# Altium PCB Right-PCB-v1.0.PcbDoc (part 1 of 2)
Units mil, origin at the board's own origin, x right, y up, seen from the top; angles counter-clockwise.
Board outline 1062.99 x 944.88 mil, 4 copper layers (Top Layer, GND, PWR, Bottom Layer), stack 45.118 mil thick; 85 components, 60 nets, 287 pads, 128 vias.
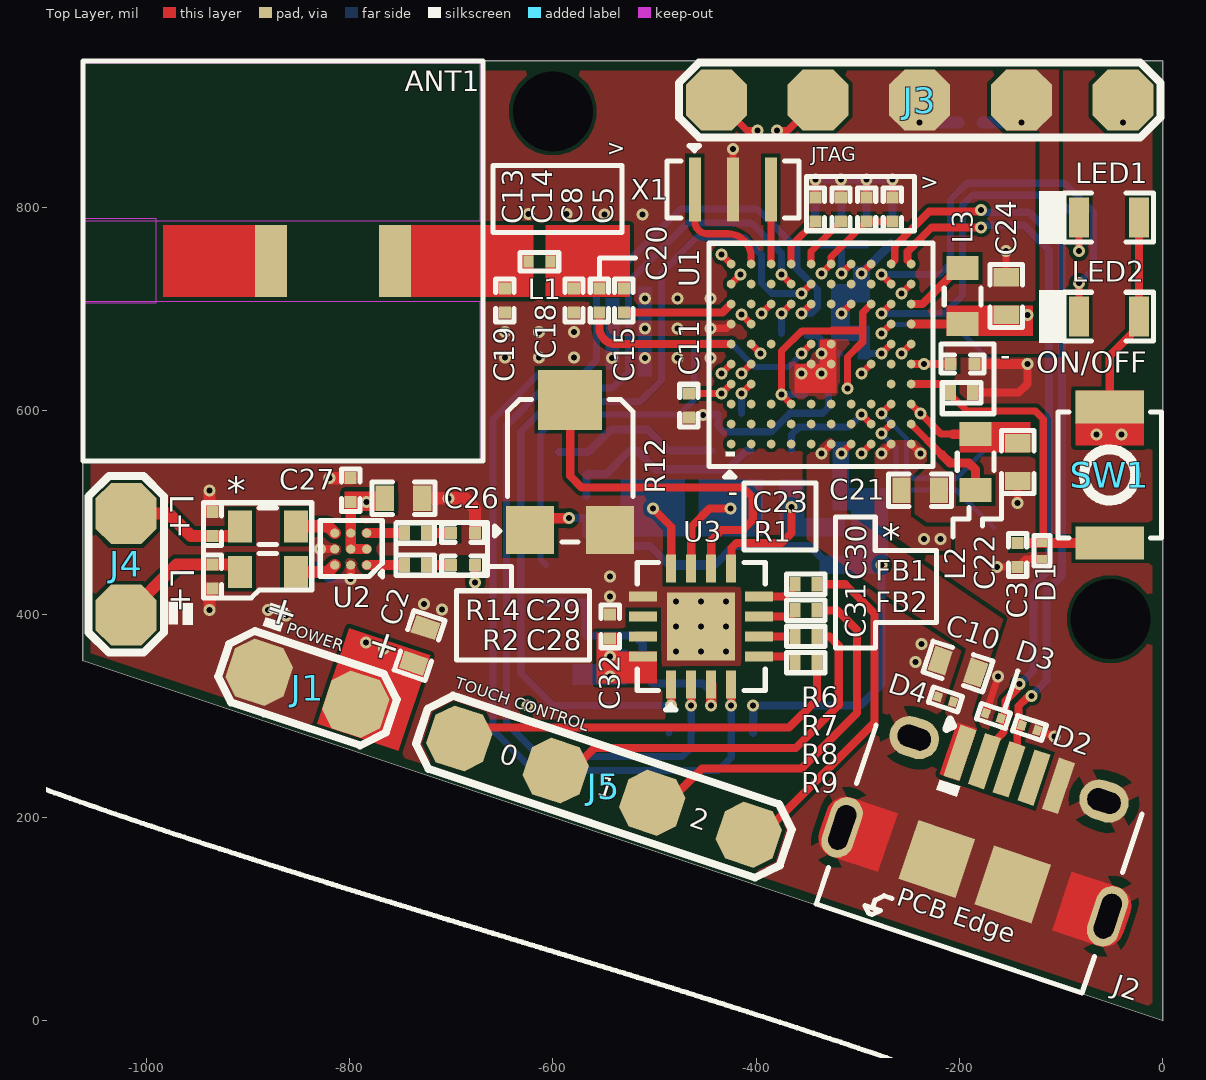
[diagram p0: Top Layer view]
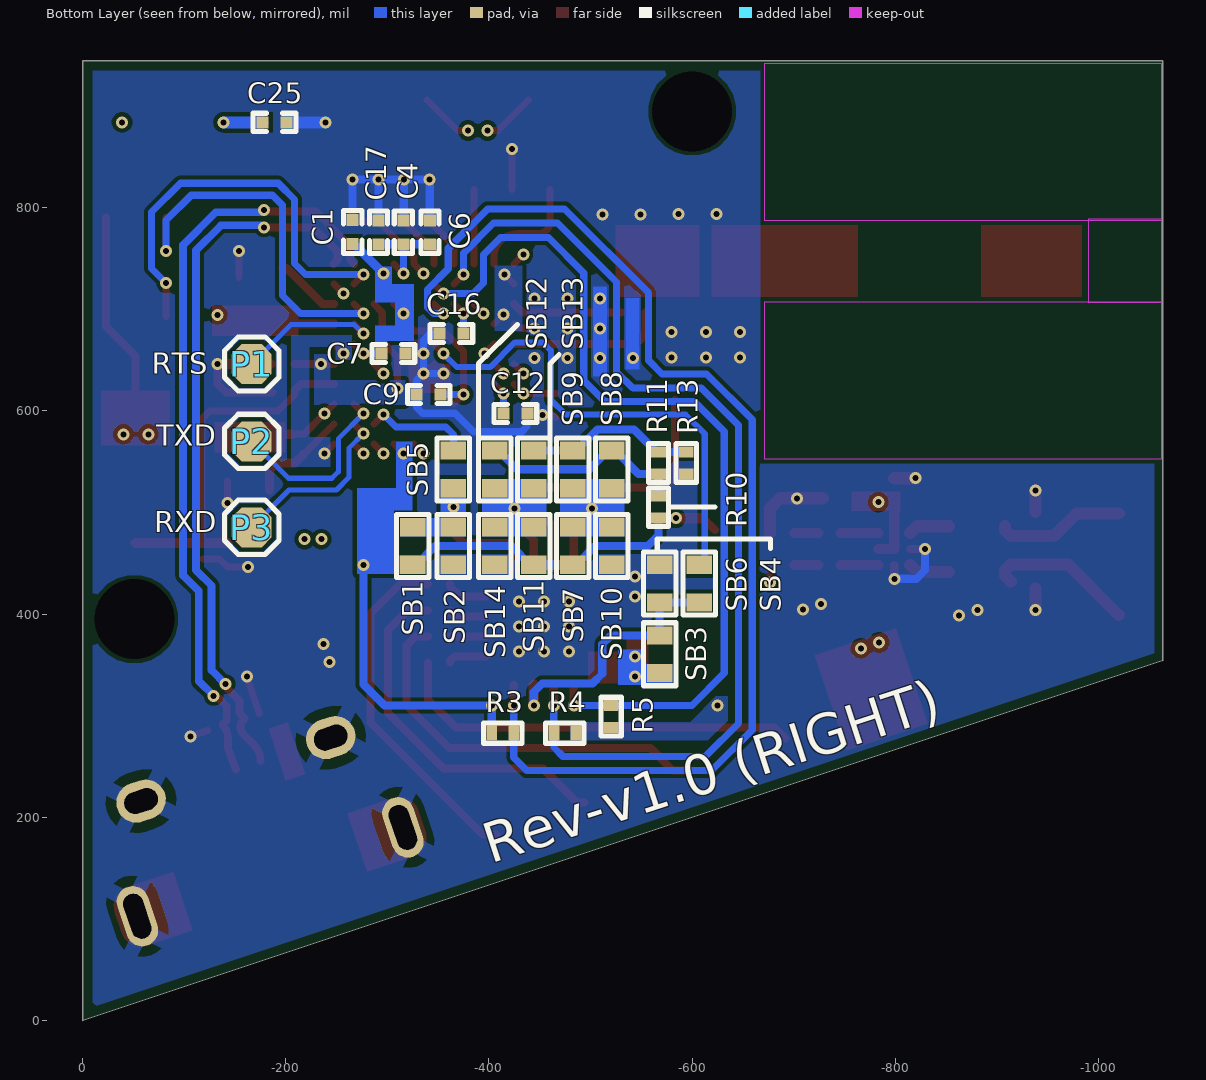
[diagram p1: Bottom Layer view, seen from below]
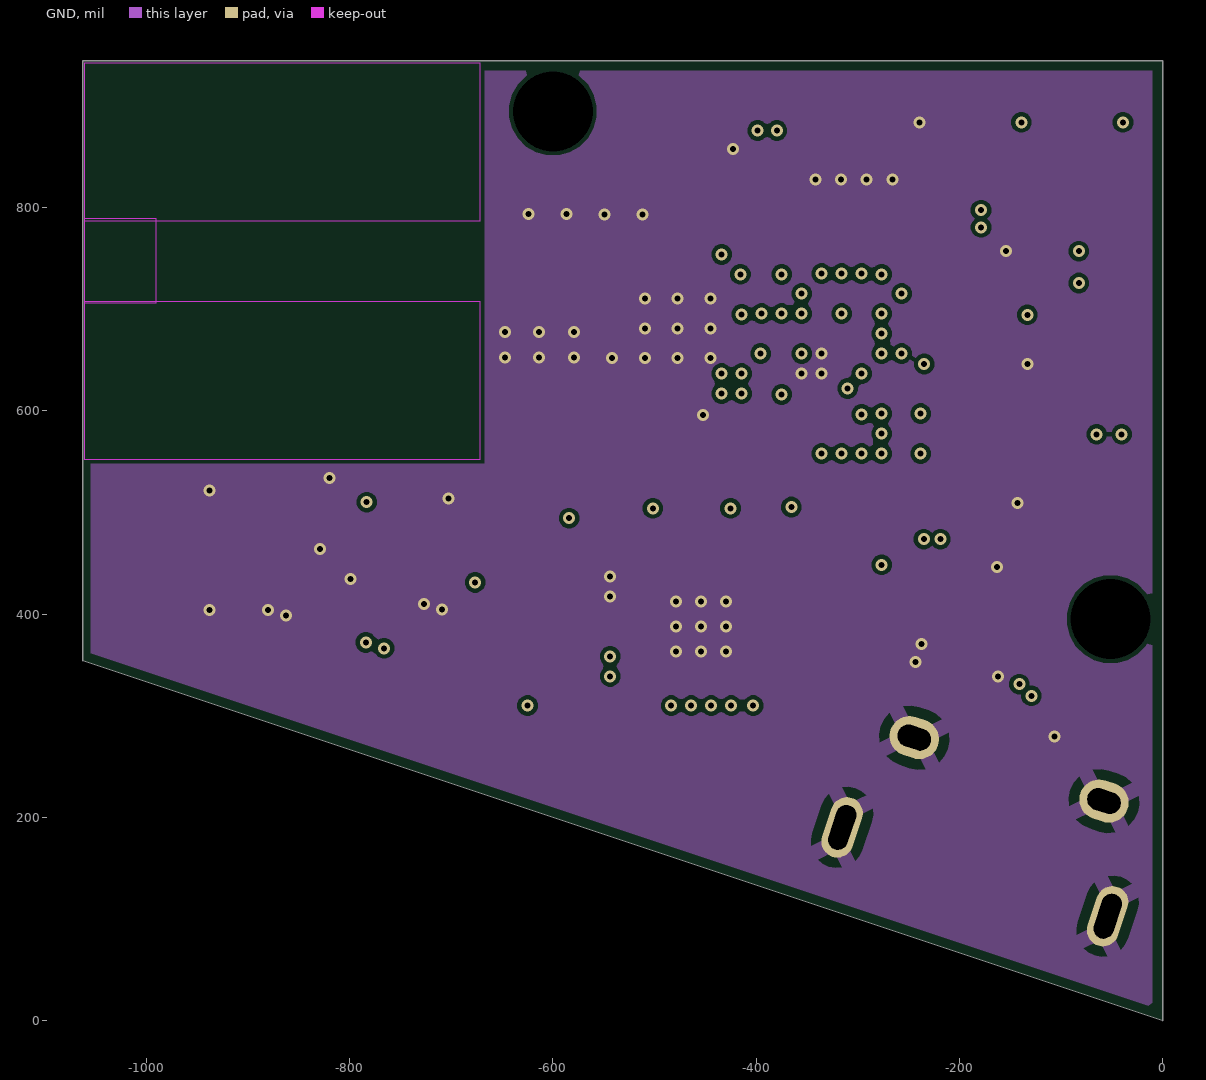
[diagram p2: GND]
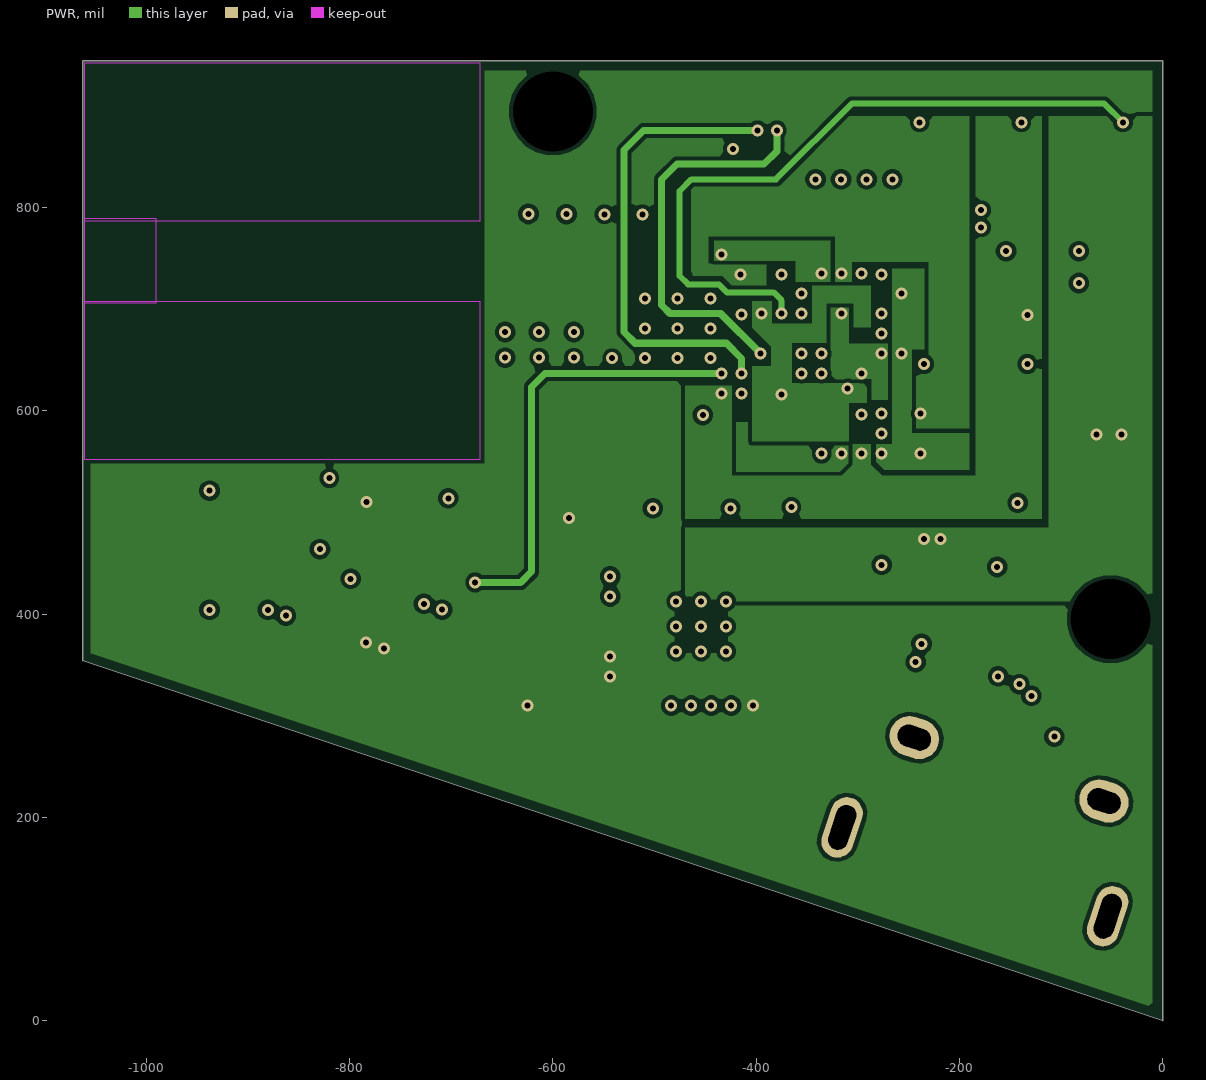
[diagram p3: PWR]
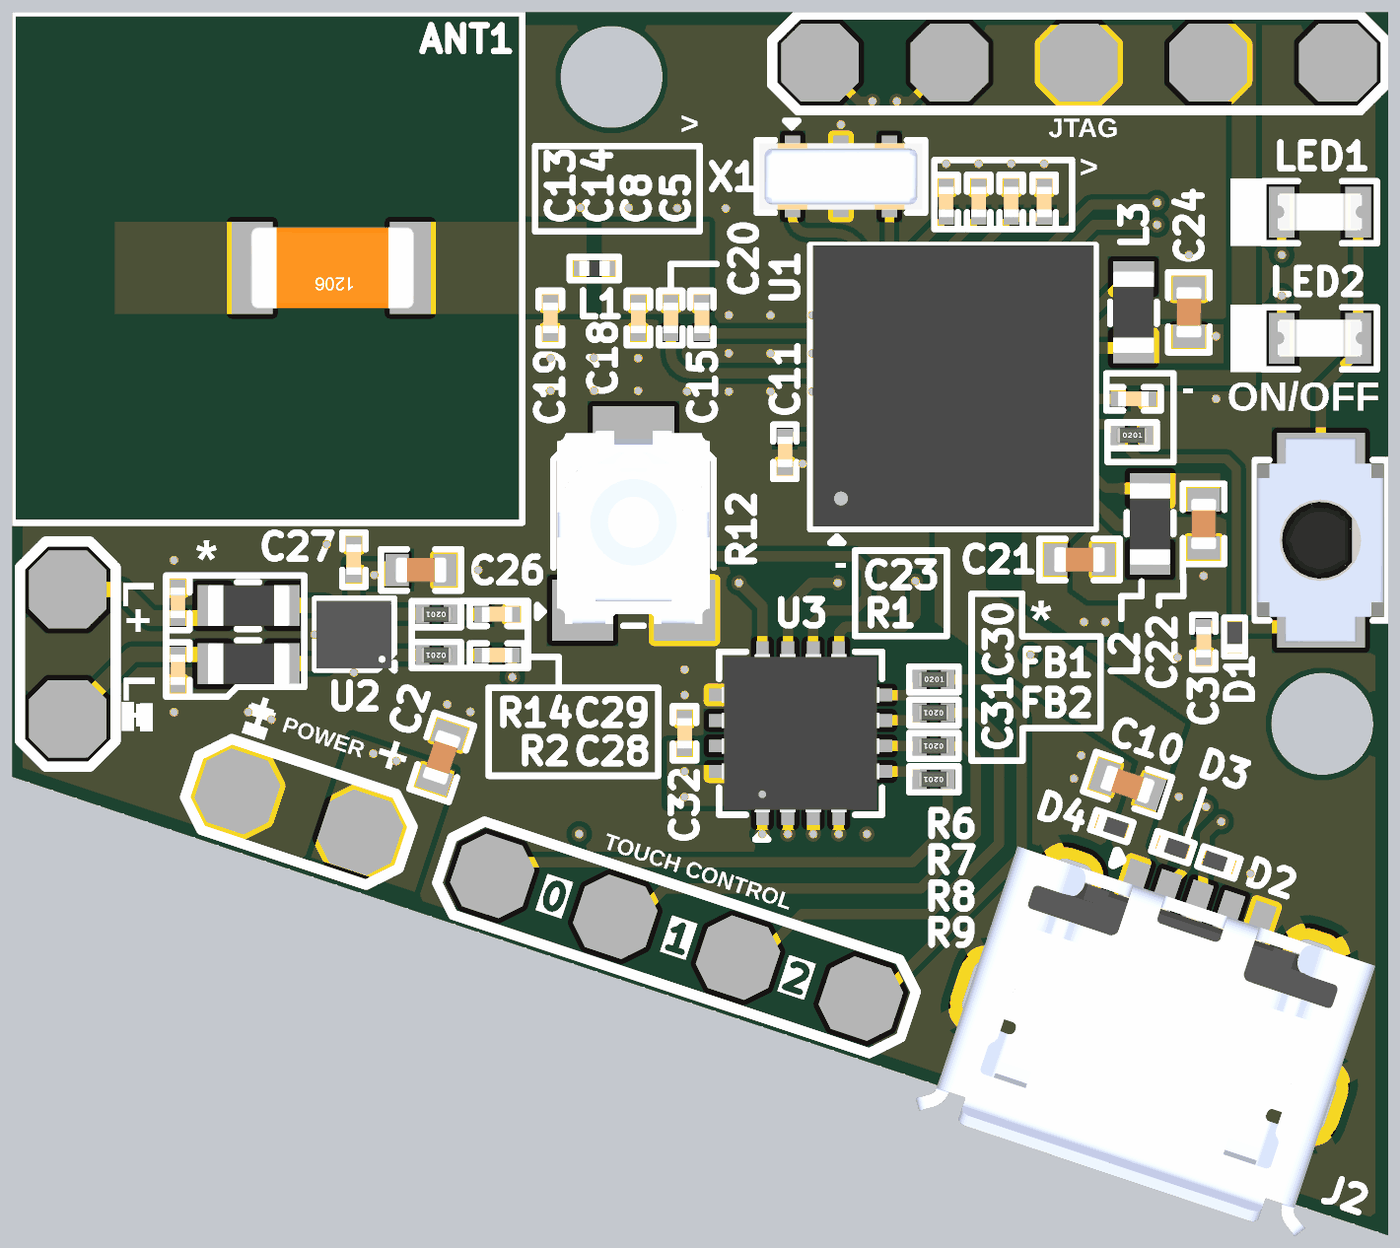
[diagram p4: 3D render of the assembled board from above, using the file's embedded part models]
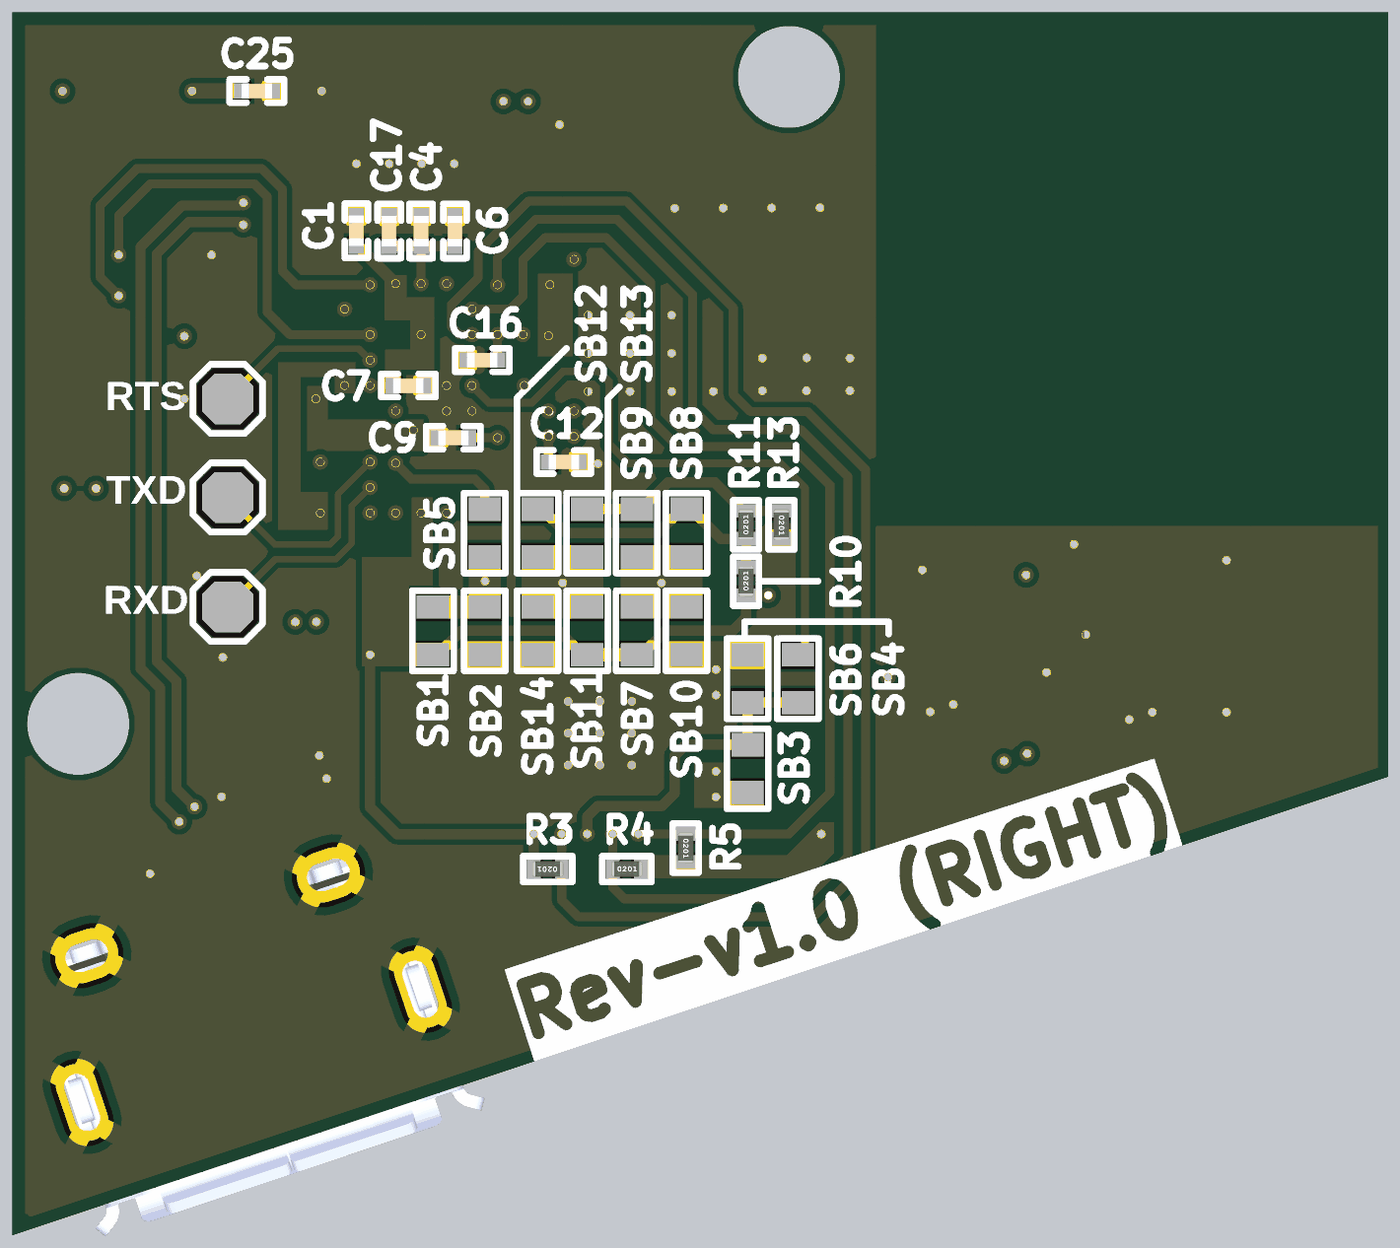
[diagram p5: 3D render of the assembled board from below, using the file's embedded part models]

## Layer stack, top to bottom
Top Solder: solder mask 1.2, Solder Resist, Dk 3.8
Top Layer: signal copper 1.378
Dielectric 2: prepreg 7.992, PP-006, Dk 4.4
GND: signal copper 1.378
Dielectric 1: core 23.622, FR-4, Dk 4.6
PWR: signal copper 1.378
Dielectric 3: prepreg 7.992, PP-006, Dk 4.4
Bottom Layer: signal copper 1.378
Bottom Solder: solder mask 1.2, Solder Resist, Dk 3.8

## Board outline
-1062.99,354.33 0,0 0,944.88 -1062.99,944.88

## Design rules (kind name [scope] priority, off if disabled: settings)
Clearance [All] p1: gap=4 ignorepadtopadclearanceinfootprint=FALSE except(3: Arc-SMDPad Track-SMDPad SMDPad-Via)
ComponentClearance [All] p1: gap=0 collisioncheckmode=3 verticalgap=10 showdistances=FALSE
DiffPairsRouting [InDifferentialPair('USB_D')] p1: maxlimit=5 minlimit=5 mostfreqgap=5 toplayer_minwidth=7.69 toplayer_maxwidth=7.69 toplayer_prefwidth=7.69 midlayer1_minwidth=4.12 midlayer1_maxwidth=4.12 midlayer1_prefwidth=4.12 midlayer2_minwidth=4.12 midlayer2_maxwidth=4.12 midlayer2_prefwidth=4.12 bottomlayer_minwidth=7.69 bottomlayer_maxwidth=7.69 bottomlayer_prefwidth=7.69 impedanceprofiledriven=TRUE impedanceprofileid={24969855-E114-4682-9538-0512A291AC3E} impedanceprofilevalue=90.000000 maxuncoupledlength=500
MatchedLengths "Schematic Matched Net Lengths" [InNetClass('GSM_USB')] p1: tolerance=50 checknetsindiffpair=TRUE checkdiffpairvsdiffpair=FALSE checkxsignals=FALSE checkothers=FALSE
MaxMinImpedance "Schematic Impedance Constraint" [InNetClass('GSM_USB')] p1: minimum=85.00 maximum=90.00
MinimumSolderMaskSliver [All] p1: minsoldermaskwidth=0
PolygonConnect [All] p1: thpad.connectstyle=Relief thpad.reliefconductorwidth=15 thpad.reliefentries=4 thpad.polygonreliefangle="45 Angle" thpad.airgapwidth=10 smdpad.connectstyle=Direct smdpad.reliefconductorwidth=10 smdpad.reliefentries=4 smdpad.polygonreliefangle="90 Angle" smdpad.airgapwidth=10 via.connectstyle=Direct via.reliefconductorwidth=10 via.reliefentries=4 via.polygonreliefangle="90 Angle" via.airgapwidth=10
RoutingVias [All] p1: holewidth=5.91 width=11.81 viastyle="Through Hole" minholewidth=5.91 minwidth=11.81 maxholewidth=5.91 maxwidth=11.81
SilkToSilkClearance [All] p1: silktosilkclearance=0
SilkToSolderMaskClearance [IsPad] p1: minsilkscreentomaskgap=0 clearancetoexposedcopper=TRUE
SolderMaskExpansion SolderMaskExpansion_Via [isvia] p1: expansion=4 istentingtop=TRUE useseparateexpansions=TRUE expansionbottom=4 istentingbottom=TRUE
SolderMaskExpansion [All] p2: expansion=4 istentingtop=FALSE
UnRoutedNet [All] p1: checkbadconnections=TRUE
Width Width_50-Ohm [(InNet('PA1OP') OR InNet('RTX'))] p1: maxlimit=8 minlimit=5.11 preferedwidth=8 toplayer_minwidth=8 midlayer1_maxwidth=5.11 midlayer1_prefwidth=5.11 midlayer2_maxwidth=5.11 midlayer2_prefwidth=5.11 bottomlayer_minwidth=8 impedanceprofiledriven=TRUE impedanceprofileid={FD0E59BD-C75E-4E98-98D1-FE3D62779C59} impedanceprofilevalue=50.000000 minimp=50.000000 maximp=50.000000 favimp=50.000000
Width [All] p2: maxlimit=15 minlimit=4 preferedwidth=6
24 further rules are at their usual default settings.

## Classes and differential pairs
differential pair class GSM_USB_Lines: USB_D
net class GSM_USB: USB_D_N USB_D_P
component class U_Touch_Amplifier: C26 C27 C28 C29 C30 C31 C32 FB1 FB2 J4 J5 R2 R3 R4 R5 R6 R7 R8 R9 R10 R11 R12 R13 R14 SB1 SB2 SB3 SB4 SB5 SB6 SB7 SB8 SB9 SB10 SB11 SB12 SB13 SB14 U2 U3
component class U_Bluetooth_SOC: ANT1 C1 C2 C3 C4 C5 C6 C7 C8 C9 C10 C11 C12 C13 C14 C15 C16 C17 C18 C19 C20 C21 C22 C23 C24 C25 D1 D2 D3 D4 J1 J2 J3 L1 L2 L3 LED1 LED2 P1 P2 P3 R1 SW1 U1 X1
differential pair USB_D: +USB_D_P -USB_D_N

## Components (designator, comment, footprint, x,y, rotation, side; value= is the part's Value field where it differs from the comment)
ANT1 "ANT3216LL00R2400A" ANT3216LL00R2400A -755.5,747.38 r180 top locked
C1 "1uF" Cap-0201 -265.87,776.08 r90 bottom locked
C2 "10uF" Cap-0402 -731.18,369.25 r71.6 top locked
C3 "0.1uF" CAP-0201 -142.64,458.23 r90 top locked
C4 "1uF" Cap-0201 -315.85,775.81 r270 bottom locked
C5 "1uF" Cap-0201 -265.87,798.31 r270 top locked
C6 "1uF" Cap-0201 -342,775.81 r270 bottom locked
C7 "1uF" Cap-0201 -306,656.46 r180 bottom locked
C8 "1uF" Cap-0201 -291.29,798.31 r270 top locked
C9 "1uF" Cap-0201 -340.76,616.17 r0 bottom locked
C10 "10uF" Cap-0402 -201.39,348.36 r161.5 top locked
C11 "1uF" Cap-0201 -466.14,605.28 r90 top locked
C12 "1uF" Cap-0201 -426.09,597.41 r180 bottom locked
C13 "1uF" Cap-0201 -341.51,798.31 r90 top locked
C14 "1uF" Cap-0201 -316.4,798.31 r90 top locked
C15 "2pF" CAP-0201 -530.28,708.66 r90 top locked
C16 "1uF" Cap-0201 -363.1,676.15 r0 bottom locked
C17 "1uF" Cap-0201 -291.29,775.81 r270 bottom locked
C18 "1.3pF" CAP-0201 -579.29,708.66 r90 top locked
C19 "3pF" CAP-0201 -647.28,708.66 r90 top locked
C20 "3pF" CAP-0201 -554.29,708.66 r90 top locked
C21 "10uF" Cap-0402 -238.5,522 r180 top locked
C22 "10uF" Cap-0402 -142.64,549.56 r90 top locked
C23 "1uF" Cap-0201 -196.85,646.16 r180 top locked
C24 "10uF" Cap-0402 -154,713.09 r270 top locked
C25 "0.1uF" CAP-0201 -189,884 r0 bottom locked
C26 "10uF" Cap-0402 -747.14,514 r180 top locked
C27 "0.1uF" CAP-0201 -799,522 r270 top locked
C28 "1uF" Cap-0201 -688.39,448.25 r180 top locked
C29 "1uF" Cap-0201 -688.39,479.75 r180 top locked
C30 "1uF" Cap-0201 -935.04,488.62 r270 top locked
C31 "1uF" Cap-0201 -935.04,437.02 r90 top locked
C32 "0.1uF" CAP-0201 -543.62,387.87 r90 top locked
D1 "PESD5V0H1BSFYL" DSN0603-2 -118.62,462.17 r90 top locked
D2 "PESD5V0H1BSFYL" DSN0603-2 -130.87,287.99 r161.5 top locked
D3 "PESD5V0H1BSFYL" DSN0603-2 -166.47,299.88 r341.5 top locked
D4 "PESD5V0H1BSFYL" DSN0603-2 -213.59,316.11 r341.5 top locked
FB1 "MPZ1608S221ATA00" "IND-0603 (1608 Metric)" -880.33,486.46 r180 top locked
FB2 "MPZ1608S221ATA00" "IND-0603 (1608 Metric)" -880.33,441.54 r180 top locked
J1 "2 Test Pad" "2 Test Pad" -794.09,311.3 r161.6 top locked
J2 "10118194-0001LF" 10118194-0001LF_ -150.94,247.2 r341.5 top locked
J3 "5 Test Pad" "5 Test Pad" -39,906 r180 top locked
J4 "2 Test Pad" "2 Test Pad" -1020,499 r270 top locked
J5 "4 Pin SMD Wire Connector" "4 Pin SMD Wire CON." -692.08,277.61 r341.6 top locked
L1 "2.7nH" IND-0201 -613.27,746.89 r180 top locked
L2 "10uH" "IND-0603 (1608 Metric)" -184,549.56 r90 top locked
L3 "10uH" "IND-0603 (1608 Metric)" -196.85,713.09 r270 top locked
LED1 "Blue" LED-0603 -52.8,790.32 r180 top locked
LED2 "RED" LED-0603 -52.8,692.83 r180 top locked
P1 "TEST POINT 0.5mm Dia" "Test-point - 0.5mm" -166.5,646.16 r180 bottom locked
P2 "TEST POINT 0.5mm Dia" "Test-point - 0.5mm" -166.5,570 r180 bottom locked
P3 "TEST POINT 0.5mm Dia" "Test-point - 0.5mm" -166.5,485.5 r180 bottom locked
R1 "1K" Res-0201 -197.83,618 r0 top locked
R2 "15k" Res-0201 -735.36,448.25 r180 top locked
R3 "4.7K" Res-0201 -413.66,282.93 r0 bottom locked
R4 "4.7K" Res-0201 -474.75,282.93 r180 bottom locked
R5 "4.7K" Res-0201 -520.22,299.17 r270 bottom locked
R6 "1K" Res-0201 -351.02,429.43 r0 top locked
R7 "100K" Res-0201 -351.02,403.72 r180 top locked
R8 "100K" Res-0201 -351.02,378.03 r180 top locked
R9 "100K" Res-0201 -351.02,352.27 r180 top locked
R10 "100K" Res-0201 -566.89,505.33 r90 bottom locked
R11 "100K" Res-0201 -566.89,548.82 r90 bottom locked
R12 "1M" TC33X-2-105E -582.99,546.89 r0 top locked
R13 "100K" Res-0201 -594.22,548.82 r270 bottom locked
R14 "15k" Res-0201 -735.36,479.75 r180 top locked
SB1 "Solder Bridge 0402" "Solder Bridge 0402" -325,467 r90 bottom locked
SB2 "Solder Bridge 0402" "Solder Bridge 0402" -365.07,467 r90 bottom locked
SB3 "Solder Bridge 0402" "Solder Bridge 0402" -568,360.5 r90 bottom locked
SB4 "Solder Bridge 0402" "Solder Bridge 0402" -568,430 r270 bottom locked
SB5 "Solder Bridge 0402" "Solder Bridge 0402" -365.07,542.5 r270 bottom locked
SB6 "Solder Bridge 0402" "Solder Bridge 0402" -606.89,430 r270 bottom locked
SB7 "Solder Bridge 0402" "Solder Bridge 0402" -482.51,467 r270 bottom locked
SB8 "Solder Bridge 0402" "Solder Bridge 0402" -520.84,542.5 r90 bottom locked
SB9 "Solder Bridge 0402" "Solder Bridge 0402" -482.51,542.5 r90 bottom locked
SB10 "Solder Bridge 0402" "Solder Bridge 0402" -520.84,467 r270 bottom locked
SB11 "Solder Bridge 0402" "Solder Bridge 0402" -444.17,467 r270 bottom locked
SB12 "Solder Bridge 0402" "Solder Bridge 0402" -405.84,542.5 r90 bottom locked
SB13 "Solder Bridge 0402" "Solder Bridge 0402" -444.17,542.5 r90 bottom locked
SB14 "Solder Bridge 0402" "Solder Bridge 0402" -405.84,467 r270 bottom locked
SW1 "B3U-1000P" B3U-1000P -52.01,536.97 r270 top locked
U1 "IS2083BM-232" 82-VFBGA -336,656 r90 top locked
U2 "TPA2011D1YFFR" 9-DSBGA -799,464 r180 top locked
U3 "MTCH1030T-E/MG" "16-QFN (3x3)." -454.02,387.87 r90 top locked
X1 "16MHz" SMD3213-3P -422.83,818 r0 top locked

## Footprints (in the part's own frame and the unit in brackets; to place one, negate y for a bottom-side part, rotate by r counter-clockwise, add the part's x,y. Pads: shape width x height; smd on the part's side, far side on the other; paste and mask are expansions set on the pad)
"2 Test Pad" [mil]
  oct 60x60 smd: 1(0,0) 2(100,0)
  silkscreen extent -37,-37 137,37
"4 Pin SMD Wire CON." [mm]
  oct 1.5x1.5 smd: 1(0,0) 2(2.54,0) 3(5.08,0) 4(7.62,0)
  silkscreen extent -0.98,-0.97 8.6,0.97
"5 Test Pad" [mil]
  oct 60x60 smd: 1(0,0) 2(100,0) 3(200,0) 4(300,0) 5(400,0)
  silkscreen extent -37,-37 437,37
9-DSBGA [mm]
  round 0.23 smd mask+0.055: A1(-0.4,0.4) A2(0,0.4) A3(0.4,0.4) B1(-0.4,0) B2(0,0) B3(0.4,0) C1(-0.4,-0.4) C2(0,-0.4) C3(0.4,-0.4)
  silkscreen extent -0.8,-0.71 0.76,0.7, body extent -0.73,-0.67 0.73,0.67, height 0.63
"16-QFN (3x3)." [mm]
  rect 0.7x0.25 smd: 1(-1.45,0.75) 2(-1.45,0.25) 3(-1.45,-0.25) 4(-1.45,-0.75) 9(1.45,-0.75) 10(1.45,-0.25) 11(1.45,0.25) 12(1.45,0.75)
  rect 0.25x0.7 smd: 5(-0.75,-1.45) 6(-0.25,-1.45) 7(0.25,-1.45) 8(0.75,-1.45) 13(0.75,1.45) 14(0.25,1.45) 15(-0.25,1.45) 16(-0.75,1.45)
  rect 1.7x1.7 smd: 17(0,0)
  silkscreen extent -2.08,-1.6 1.6,1.6, body extent -1.55,-1.55 1.55,1.55, height 0.99
82-VFBGA [mm]
  round 0.22 smd paste+0 mask+0.055: A1(-2.25,2.25) A2(-1.75,2.25) A3(-1.25,2.25) A4(-0.75,2.25) A5(-0.25,2.25) A6(0.25,2.25) A7(0.75,2.25) A8(1.25,2.25) A9(1.75,2.25) A10(2.25,2.25) B1(-2.25,1.75) B2(-1.75,1.75) B3(-1.25,1.75) B4(-0.75,1.75) B5(-0.25,1.75) B6(0.25,1.75) B7(0.75,1.75) B8(1.25,1.75) B9(1.75,1.75) B10(2.25,1.75) C1(-2.25,1.25) C2(-1.75,1.25) C3(-1.25,1.25) C6(0.25,1.25) C8(1.25,1.25) C9(1.75,1.25) C10(2.25,1.25) D1(-2.25,0.75) D2(-1.75,0.75) D3(-1.25,0.75) D8(1.25,0.75) D9(1.75,0.75) D10(2.25,0.75) E1(-2.25,0.25) E2(-1.75,0.25) E3(-1.25,0.25) E5(-0.25,0.25) E6(0.25,0.25) E8(1.25,0.25) E9(1.75,0.25) E10(2.25,0.25) F1(-2.25,-0.25) F2(-1.75,-0.25) F3(-1.25,-0.25) F5(-0.25,-0.25) F6(0.25,-0.25) F8(1.25,-0.25) F9(1.75,-0.25) F10(2.25,-0.25) G1(-2.25,-0.75) G2(-1.75,-0.75) G3(-1.25,-0.75) G8(1.25,-0.75) G9(1.75,-0.75) G10(2.25,-0.75) H1(-2.25,-1.25) H2(-1.75,-1.25) H3(-1.25,-1.25) H5(-0.25,-1.25) H8(1.25,-1.25) H9(1.75,-1.25) H10(2.25,-1.25) J1(-2.25,-1.75) J2(-1.75,-1.75) J3(-1.25,-1.75) J4(-0.75,-1.75) J5(-0.25,-1.75) J6(0.25,-1.75) J7(0.75,-1.75) J8(1.25,-1.75) J9(1.75,-1.75) J10(2.25,-1.75) K1(-2.25,-2.25) K2(-1.75,-2.25) K3(-1.25,-2.25) K4(-0.75,-2.25) K5(-0.25,-2.25) K6(0.25,-2.25) K7(0.75,-2.25) K8(1.25,-2.25) K9(1.75,-2.25) K10(2.25,-2.25)
  silkscreen extent -3.07,-2.79 2.77,2.81, body extent -2.76,-2.76 2.76,2.76, height 0.89
10118194-0001LF_ [mm]
  rect 0.42x1.35 smd: 1(-1.3,0) 2(-0.65,0) 3(0,0) 4(0.65,0) 5(1.3,0)
  rect 1.5x1.55 smd: MP1(-1,-2.7) MP2(1,-2.7)
  oval 1.25x1 hole 0.55 slot 0.85 at 0 deg: S1(-2.5,0) S2(2.5,0)
  oval 0.8x1.55 hole 0.5 slot 1.15 at 90 deg: S3(3.5,-2.7) S4(-3.5,-2.7)
  Top Layer region: 193 vertices and 0 holes, not listed, extent 2.3,-3.48 4,-1.925
  Top Layer region: 193 vertices and 0 holes, not listed, extent -4,-3.475 -2.3,-1.92
  silkscreen extent -3.51,-4.72 3.51,0.71, body extent -4.02,-5.34 4.03,0.19, height 2.69
ANT3216LL00R2400A [mm]
  rect 0.8x1.8 smd: 1(0,0) 2(3.1,0)
  Top Layer region: 3.277,-0.9 5.8,-0.9 5.8,0.9 3.277,0.9
  Top Layer region: -0.178,0.9 -2.2,0.9 -2.2,-0.9 -0.178,-0.9
  Keep-Out Layer region: -2.134,-4.953 7.772,-4.953 7.772,-1.016 -2.134,-1.016
  Keep-Out Layer region: -2.134,1.016 7.772,1.016 7.772,4.953 -2.134,4.953
  Keep-Out Layer region: 5.969,-1.067 7.772,-1.067 7.772,1.041 5.969,1.041
  silkscreen extent -2.2,-5 7.8,5, body extent -0.08,-0.8 3.12,0.8, height 1
B3U-1000P [mm] "SWITCH TACTILE SPST-NO 0.05A 12V"
  rect 0.82x1.72 smd: 1(-1.7,0) 2(1.7,0)
  silkscreen extent -1.57,-1.3 1.57,1.3, body extent -2,-1.26 2,1.24, height 1.6
Cap-0201 [mm]
  rect 0.3x0.3 smd mask+0.055: 1(-0.3,0) 2(0.3,0)
  silkscreen extent -0.53,-0.23 0.53,0.23, body extent -0.3,-0.15 0.3,0.15, height 0.28
CAP-0201 [mm]
  rect 0.3x0.3 smd mask+0.055: 1(-0.3,0) 2(0.3,0)
  silkscreen extent -0.53,-0.23 0.53,0.23, body extent -0.3,-0.15 0.3,0.15, height 0.28
Cap-0402 [mil]
  rect 18x25 smd mask+2.36: 1(-18.5,0) 2(18.5,0)
  silkscreen extent -31,-16 31,16, body extent -20,-10 20,10, height 19
DSN0603-2 [mm]
  rect 0.2x0.24 smd mask+0.055: 1(-0.2,0) 2(0.2,0)
  silkscreen extent -0.38,-0.2 0.38,0.2, body extent -0.3,-0.15 0.3,0.15, height 0.32
IND-0201 [mm]
  rect 0.25x0.3 smd mask+0.055: 1(-0.275,0) 2(0.275,0)
  silkscreen extent -0.48,-0.23 0.48,0.23, body extent -0.3,-0.15 0.3,0.15, height 0.15
"IND-0603 (1608 Metric)" [mm] "0.063\" L x 0.032\" W (1.60mm x 0.80mm)"
  rect 0.6x0.8 smd: 1(-0.7,0) 2(0.7,0)
  silkscreen extent -0.2,-0.46 0.23,0.46, body extent -0.8,-0.4 0.8,0.4, height 0.78
LED-0603 [mm]
  rect 0.5x1 smd: 1(-0.75,0) 2(0.75,0)
  silkscreen extent -1.12,-0.66 1.75,0.66, body extent -0.82,-0.37 0.82,0.36, height 0.68
Res-0201 [mm]
  rect 0.27x0.37 smd mask+0.055: 1(-0.275,0) 2(0.275,0)
  silkscreen extent -0.48,-0.25 0.48,0.25, body extent -0.3,-0.15 0.3,0.15, height 0.29
SMD3213-3P [mm]
  rect 0.3x1.6 smd: 1(-0.95,0) 2(0,0) 3(0.95,0)
  silkscreen extent -1.65,-0.71 1.65,1.09, body extent -1.6,-0.65 1.6,0.65, height 1
"Solder Bridge 0402" [mil]
  rect 18x25 smd mask+2.17: 1(-18.5,0) 2(18.5,0)
  silkscreen extent -32,-17 32,16
TC33X-2-105E [mm]
  rect 1.2x1.2 smd: 1(-1,-1.625) 3(1,-1.625)
  rect 1.6x1.5 smd: 2(0,1.625)
  silkscreen extent -1.89,-1.93 1.57,1.63, body extent -1.5,-1.9 1.5,1.9, height 1.2
"Test-point - 0.5mm" [mm]
  oct 1x1 smd: 1(0,0)
  silkscreen extent -0.68,-0.68 0.68,0.68

## Part data
ANT1: "5.05dBi Chip antenna Linear 160MHz 2.45GHz 1W 1206 Antennas ROHS", LCSC Part Number=C293767, Manufacturer=YAGEO, Package=1206, ComponentLink1Description=LCSC, ComponentLink1URL=https://www.lcsc.com/product-detail/Antennas_YAGEO-ANT3216LL00R2400A_C293767.html, Item Type=Antenna, Manufacturer Part Number=ANT3216LL00R2400A
C1 C4 C5 C6 C7 C8 C9 C11 C12 C13 C14 C16 C17 C23 C28 C29 C30 C31: library part CC0201KRX5R5BB105, "CAP CER 1UF 6.3V X5R 0201", Case Code (Imperial)=0201, Case Code (Metric)=0603, LCSC Part Number=C541330, Manufacturer=Yageo, Max Operating Temperature=85°C, Min Operating Temperature=-55°C, Tolerance=10%, Voltage Rating=6.3V, Capacitance=1uF, Case/Package=0201, Category="Ceramic Capacitors", ComponentLink1Description=http://www.yageo.com/documents/recent/UPY-GPHC_X5R_4V-to-50V_25.pdf?src-supplier=Digi-Key, ComponentLink1URL=http://www.yageo.com/documents/recent/UPY-GPHC_X5R_4V-to-50V_25.pdf?src-supplier=Digi-Key, ComponentLink2Description=https://www.yageo.com/upload/media/product/productsearch/datasheet/mlcc/UPY-GPHC_X5R_4V-to-50V_26.pdf?src-supplier=Digi-Key, ComponentLink2URL=https://www.yageo.com/upload/media/product/productsearch/datasheet/mlcc/UPY-GPHC_X5R_4V-to-50V_26.pdf?src-supplier=Digi-Key, Item Type=Capacitor, Manufacturer Part Number=CC0201KRX5R5BB105, Mount="Surface Mount", Packaging="Cut Tape", Pricing 1="15000=0.00740 (USD)", RoHS=Yes, RoHS Compliant=Yes, Stock 1=600000, Supplier 1="Arrow Electronics", Supplier Part Number 1=CC0201KRX5R5BB105
C2 C10 C21 C22 C24 C26: library part CL05A106MP5NUNC, "CAP CER 10UF 10V X5R 0402", Case Code (Imperial)=0402, Case Code (Metric)=1005, Dielectric=X5R, LCSC Part Number=C315248, Manufacturer=Samsung, Max Operating Temperature=85°C, Min Operating Temperature=-55°C, Package Quantity=1, Tolerance=20%, Voltage Rating=10V, Capacitance=10uF, Case/Package=0402, Category="Ceramic Capacitors", ComponentLink1Description=https://datasheet.ciiva.com/25721/cl05a106mp5nunc-25721584.pdf?src-supplier=Digi-Key, ComponentLink1URL=https://datasheet.ciiva.com/25721/cl05a106mp5nunc-25721584.pdf?src-supplier=Digi-Key, ComponentLink2Description=https://datasheet.ciiva.com/26838/getdatasheetpartid-745310-26838170.pdf?src-supplier=Verical, ComponentLink2URL=https://datasheet.ciiva.com/26838/getdatasheetpartid-745310-26838170.pdf?src-supplier=Verical, Construction=Flat, Contact Plating=Tin, Depth=0.5mm, Item Type=Capacitor, Lead Free="Lead Free", Length=1mm, Manufacturer Part Number=CL05A106MP5NUNC, Mount="Surface Mount", Packaging="Tape and Reel", Pricing 1="10000=0.02537 (USD)", Radiation Hardening=No, RoHS=Yes, RoHS Compliant=Yes, Series=CL, Stock 1=1729850, Supplier 1=Avnet, Supplier Part Number 1=CL05A106MP5NUNC, Termination=Wraparound, Thickness=0.028inch, Width=0.02inch
C3 C25 C27 C32: library part CC0201KRX5R6BB104, "CAP CER 0.1UF 10V X5R 0201", Capacitance=100nF, Case Code (Imperial)=0201, Case Code (Metric)=0603, Dielectric=X5R, LCSC Part Number=C190183, Manufacturer=Yageo, Max Operating Temperature=85°C, Min Operating Temperature=-55°C, Resistor Type=Ceramic, Supplier Part Number 1=603-CC201KRX5R6BB104, Tolerance=10%, Voltage Rating=10V, Case/Package=0201, Category="Ceramic Capacitors", ComponentLink1Description=https://datasheet.ciiva.com/11587/upy-gphc-x5r-4v-to-50v-12-11587190.pdf?src-supplier=Avnet, ComponentLink1URL=https://datasheet.ciiva.com/11587/upy-gphc-x5r-4v-to-50v-12-11587190.pdf?src-supplier=Avnet, Construction=Flat, Depth=0.3mm, Halogen Free="Halogen Free", Height=0.3mm, Lead Free="Lead Free", Length=0.6mm, Manufacturer Part Number=CC0201KRX5R6BB104, Mount="Surface Mount", Packaging="Tape and Reel", Pricing 1="1=0.10000, 10=0.02400, 50=0.02400, 100=0.01900, 1000=0.01100, 10000=0.00900 (USD)", Radiation Hardening=No, RoHS=Yes, RoHS Compliant=Yes, Series=CC, Stock 1=824403, Supplier 1=Mouser, Termination=SMD/SMT, Thickness=0.013inch, Voltage Rating (DC)=10V, Weight=6E-06oz, Width=0.012inch
C15: library part GRM0335C1E2R0BA01D, "CAP CER 2PF 25V C0G/NP0 0201", LCSC Part Number=C161383, Manufacturer=Murata, Category="Ceramic Capacitors", ComponentLink1Description=https://datasheet.ciiva.com/29535/grm0335c1e2r0ba01-01-29535294.pdf?src-supplier=Digi-Key, ComponentLink1URL=https://datasheet.ciiva.com/29535/grm0335c1e2r0ba01-01-29535294.pdf?src-supplier=Digi-Key, Item Type=Capacitor, Manufacturer Part Number=GRM0335C1E2R0BA01D, Pricing 1="1=0.053, 10=0.0058, 25=0.004, 100=0.0026, 500=0.0024, 1000=0.0023, 3000=0.0022, 6000=0.0021, 15000=0.002, 30000=0.0019 (USD)", RoHS=Yes, Stock 1=65754, Supplier 1="Arrow Electronics", Supplier Part Number 1=GRM0335C1E2R0BA01D
C18: library part GRM0335C1H1R3BA01D, "CAP CER 1.3PF 50V C0G/NP0 0201", LCSC Part Number=C237529, Manufacturer=Murata, Temperature Coefficient=30ppm/°C, Category="Ceramic Capacitors", ComponentLink1Description=https://datasheet.ciiva.com/6270/partnumbering-e-01-6270997.pdf?src-supplier=Digi-Key, ComponentLink1URL=https://datasheet.ciiva.com/6270/partnumbering-e-01-6270997.pdf?src-supplier=Digi-Key, ComponentLink2Description=https://datasheet.ciiva.com/6271/partnumbering-e-01-6271000.pdf?src-supplier=Digi-Key, ComponentLink2URL=https://datasheet.ciiva.com/6271/partnumbering-e-01-6271000.pdf?src-supplier=Digi-Key, ComponentLink3Description=https://datasheet.ciiva.com/6271/partnumbering-e-01-6271002.pdf?src-supplier=Digi-Key, ComponentLink3URL=https://datasheet.ciiva.com/6271/partnumbering-e-01-6271002.pdf?src-supplier=Digi-Key, Height=330um, Item Type=Capacitor, Manufacturer Part Number=GRM0335C1H1R3BA01D, Material=4241ConductorMaterial, Pricing 1="15000=0.0024, 30000=0.0022, 75000=0.0018, 105000=0.0016, 150000=0.0015 (USD)", RoHS=Yes, Stock 1=135000, Supplier 1="Arrow Electronics", Supplier Part Number 1=GRM0335C1H1R3BA01D
C19 C20: library part GRM0335C1H3R0BA01D, "CAP CER 3PF 50V C0G/NP0 0201", LCSC Part Number=C237430, Manufacturer=Murata, Supplier Part Number 1=1851754, Temperature Coefficient=30ppm/°C, Category="Ceramic Capacitors", ComponentLink1Description=https://datasheet.ciiva.com/29538/partnumbering-e-01-29538501.pdf?src-supplier=Digi-Key, ComponentLink1URL=https://datasheet.ciiva.com/29538/partnumbering-e-01-29538501.pdf?src-supplier=Digi-Key, Height=330um, Item Type=Capacitor, Manufacturer Part Number=GRM0335C1H3R0BA01D, Material=4241ConductorMaterial, Pricing 1="1000=0.004, 5000=0.003, 10000=0.003 (GBP)", RoHS=Yes, Stock 1=11000, Supplier 1=Rs
D1 D2 D3 D4: "TVS DIODE 5VWM 6.3VC DSN0603-2", LCSC Part Number=C477989, Manufacturer=Nexperia, Category="ESD and Circuit Protection ICs", ComponentLink1Description=http://www.farnell.com/datasheets/1961312.pdf?src-supplier=Farnell, ComponentLink1URL=http://www.farnell.com/datasheets/1961312.pdf?src-supplier=Farnell, ComponentLink2Description=https://assets.nexperia.com/documents/data-sheet/PESD5V0H1BSF.pdf?src-supplier=Digi-Key, ComponentLink2URL=https://assets.nexperia.com/documents/data-sheet/PESD5V0H1BSF.pdf?src-supplier=Digi-Key, ComponentLink3Description=http://www.farnell.com/datasheets/1961312.pdf?src-supplier=Newark, ComponentLink3URL=http://www.farnell.com/datasheets/1961312.pdf?src-supplier=Newark, Item Type=Diode, Manufacturer Part Number=PESD5V0H1BSFYL, Pricing 1="18000=0.06453, 36000=0.06278, 54000=0.06104, 90000=0.05930, 180000=0.05755, 900000=0.05581, 1800000=0.05406 (USD)", RoHS=Yes, RoHS Compliant=Yes, Stock 1=9000, Supplier 1=Avnet, Supplier Part Number 1=PESD5V0H1BSFYL
FB1 FB2: "FERRITE BEAD 220 OHM 0603 1LN", Case Code (Imperial)=0603, Case Code (Metric)=1608, Current Rating=2.2A, DC Resistance (DCR)=50mR, LCSC Part Number=C76815, Manufacturer=TDK, Package Quantity=1, Test Frequency=100MHz, Tolerance=25%, Case/Package=0603, Category="Ferrite Beads and Chips", ComponentLink1Description=https://datasheet.ciiva.com/8077/55167-8077073.pdf?src-supplier=Element14, ComponentLink1URL=https://datasheet.ciiva.com/8077/55167-8077073.pdf?src-supplier=Element14, ComponentLink2Description=https://datasheet.ciiva.com/8077/55167-8077071.pdf?src-supplier=Element14, ComponentLink2URL=https://datasheet.ciiva.com/8077/55167-8077071.pdf?src-supplier=Element14, ComponentLink3Description=https://datasheet.ciiva.com/46381/1486324-46381628.pdf?src-supplier=Element14, ComponentLink3URL=https://datasheet.ciiva.com/46381/1486324-46381628.pdf?src-supplier=Element14, ComponentLink4Description=https://datasheet.ciiva.com/46366/print-detail-pdf-phplangenpart-nompz1608s221ata00nreimp-unit-xmhz-46366044.pdf?src-supplier=Onlinecomponents.com, ComponentLink4URL=https://datasheet.ciiva.com/46366/print-detail-pdf-phplangenpart-nompz1608s221ata00nreimp-unit-xmhz-46366044.pdf?src-supplier=Onlinecomponents.com, Core Material=Ferrite, ESR=50mR, Height=0.037inch, Impedance=220R, Item Type="Ferrite Bead", Lead Free="Lead Free", Length=0.063inch, Manufacturer Part Number=MPZ1608S221ATA00, Max Current Rating=2.2A, Max DC Current=2.2A, Mounting Technology="Surface Mount", Number of Lines=1, Packaging="Cut Tape", Pins=2, Pricing="4000=0.02405, 8000=0.02275, 16000=0.02145, 24000=0.01953, 32000=0.01827 (USD)", Reach SVHC Compliant=No, RMS Current (Irms)=2.2A, RoHS=Yes, RoHS Compliant=Yes, Series=MPZ, Stock=4000, Supplier=Avnet, Supplier Part Number=MPZ1608S221ATA00, Width=0.031inch
J1 J3 J4: "Wire Connecting Pad", Item Type="Test Point"
  J1 J4: Manufacturer Part Number="2 Test Pad"
  J3: Manufacturer Part Number="5 Test Pad"
J2: "CONN RCPT USB2.0 MICRO B SMD R/A", Color=Black, Current Rating=1.8A, Flammability Rating="UL94 V-0", Insulation Resistance=1GR, LCSC Part Number=C132563, Manufacturer="Amphenol FCI", Max Operating Temperature=85°C, Max Voltage Rating (AC)=100V, Min Operating Temperature=-55°C, Package Quantity=9600, Supplier Part Number 1=609-4618-1-ND, ComponentLink1Description=http://www.amphenol-icc.com/media/wysiwyg/files/drawing/10118194.pdf?src-supplier=Digi-Key, ComponentLink1URL=http://www.amphenol-icc.com/media/wysiwyg/files/drawing/10118194.pdf?src-supplier=Digi-Key, ComponentLink2Description=https://cdn.amphenol-icc.com/media/wysiwyg/files/drawing/10118194.pdf?src-supplier=Mouser, ComponentLink2URL=https://cdn.amphenol-icc.com/media/wysiwyg/files/drawing/10118194.pdf?src-supplier=Mouser, ComponentLink3Description=https://cdn.amphenol-icc.com/media/wysiwyg/files/drawing/10118194.pdf?src-supplier=Verical, ComponentLink3URL=https://cdn.amphenol-icc.com/media/wysiwyg/files/drawing/10118194.pdf?src-supplier=Verical, Connector Type=USB,Receptacle, Contact Material="Copper Alloy", Contact Plating=Gold, Depth=5mm, Features=Shielded, Gender=Receptacle, Housing Material=Polymer, Item Type="USB B Connector", Lead Free="Lead Free", Length=8.05mm, Manufacturer Part Number=10118194-0001LF, Mount="Surface Mount,Horizontal", Number of Contacts=5, Number of Ports=1, Number of Terminals=5, Orientation="Right Angle", Packaging="Tape and Reel", Pitch=0.65mm, Pricing 1="1=0.43, 10=0.405, 25=0.3648, 50=0.3242, 100=0.3107, 250=0.28368, 500=0.27016 (USD)", Radiation Hardening=No, Stock 1=35943, Supplier 1=Digi-Key, Termination=Solder
J5: "Wire Connecting Pads", Item Type="SMD Pads", Manufacturer Part Number="4 Pin SMD Wire Connector"
L1: library part LQP03TN2N7B02D, "FIXED IND 2.7NH 500MA 200MOHM SM", Case Code (Imperial)=0201, Case Code (Metric)=0603, Current=350mA, Current Rating=500mA, DC Resistance (DCR)=200mR, LCSC Part Number=C98043, Manufacturer=Murata, Max Operating Temperature=125°C, Min Operating Temperature=-55°C, Package Quantity=1, Self Resonant Frequency=6GHz, Supplier Part Number 1=1065349, Test Frequency=500MHz, Tolerance=3%, Case/Package=0201, Category="Fixed Inductors", ComponentLink1Description=http://www.farnell.com/datasheets/1888743.pdf?src-supplier=Farnell, ComponentLink1URL=http://www.farnell.com/datasheets/1888743.pdf?src-supplier=Farnell, ComponentLink2Description=http://www.mouser.com/ds/2/281/c51e-794816.pdf?src-supplier=Mouser, ComponentLink2URL=http://www.mouser.com/ds/2/281/c51e-794816.pdf?src-supplier=Mouser, ComponentLink3Description=https://media.digikey.com/pdf/Data%20Sheets/Murata%20PDFs/LQP03_Series_Br.pdf?src-supplier=Digi-Key, ComponentLink3URL=https://media.digikey.com/pdf/Data%20Sheets/Murata%20PDFs/LQP03_Series_Br.pdf?src-supplier=Digi-Key, ComponentLink4Description=http://components.arrow.com/part/dataview/49670632S8721729N2606?src-supplier=Arrow+Electronics, ComponentLink4URL=http://components.arrow.com/part/dataview/49670632S8721729N2606?src-supplier=Arrow+Electronics, ComponentLink5Description=https://datasheet.octopart.com/LQP03TN2N7B02D-Murata-datasheet-26765549.pdf?src-supplier=Future+Electronics, ComponentLink5URL=https://datasheet.octopart.com/LQP03TN2N7B02D-Murata-datasheet-26765549.pdf?src-supplier=Future+Electronics, ComponentLink6Description=http://psearch.en.murata.com/inductor/product/LQP03TN2N7B02%23.pdf?src-supplier=Avnet, ComponentLink6URL=http://psearch.en.murata.com/inductor/product/LQP03TN2N7B02%23.pdf?src-supplier=Avnet, ComponentLink7Description=http://search.murata.co.jp/Ceramy/image/img/w_hinm/S0084E.pdf?src-supplier=Digi-Key, ComponentLink7URL=http://search.murata.co.jp/Ceramy/image/img/w_hinm/S0084E.pdf?src-supplier=Digi-Key, ComponentLink8Description=http://www.farnell.com/datasheets/1888743.pdf?src-supplier=Newark, ComponentLink8URL=http://www.farnell.com/datasheets/1888743.pdf?src-supplier=Newark, ComponentLink9Description=http://www.farnell.com/datasheets/1888743.pdf?src-supplier=Element14, ComponentLink9URL=http://www.farnell.com/datasheets/1888743.pdf?src-supplier=Element14, ComponentLink10Description=https://datasheet.octopart.com/LQP03TN2N7B02D-Murata-datasheet-141404629.pdf?src-supplier=TME, ComponentLink10URL=https://datasheet.octopart.com/LQP03TN2N7B02D-Murata-datasheet-141404629.pdf?src-supplier=TME, Core Material=Non-Magnetic, DC Current=500mA, Depth=0.33mm, Height=0.3mm, Height - Seated (Max)=0.013inch, Inductance=2.7nH, Item Type=Inductor, Lead Free="Lead Free", Length=0.024inch, Manufacturer Part Number=LQP03TN2N7B02D, Max DC Current=500mA, Military Standard=Not, Mount="Surface Mount", Packaging="Tape and Reel", Pricing 1="200=0.007 (GBP)", Q Factor=14, Reach SVHC Compliant=No, RoHS=Yes, RoHS Compliant=Yes, Series=LQP03TN_02, Shielding=Unshielded, Stock 1=4000, Supplier 1=Rs, Technology="THIN FILM", Termination=SMD/SMT, Width=0.012inch
L2 L3: library part LQM18FN100M00D, "FIXED IND 10UH 50MA 1.17 OHM SMD", Case Code (Imperial)=0603, Case Code (Metric)=1608, Current Rating=50mA, DC Resistance (DCR)=1.17R, LCSC Part Number=C86083, Manufacturer=Murata, Max Operating Temperature=125°C, Min Operating Temperature=-55°C, Package Quantity=4000, Self Resonant Frequency=30MHz, Supplier Part Number=7242696, Test Frequency=1MHz, Tolerance=20%, Case/Package=0603, Category="Fixed Inductors", ComponentLink1Description=https://datasheet.ciiva.com/11799/0900766b80f15512-11799471.pdf?src-supplier=Rs, ComponentLink1URL=https://datasheet.ciiva.com/11799/0900766b80f15512-11799471.pdf?src-supplier=Rs, ComponentLink2Description=https://datasheet.ciiva.com/3865/286lqm18fn100m0023-3865365.pdf?src-supplier=Arrow+Electronics, ComponentLink2URL=https://datasheet.ciiva.com/3865/286lqm18fn100m0023-3865365.pdf?src-supplier=Arrow+Electronics, ComponentLink3Description=https://datasheet.ciiva.com/1039/l0075s0097lqm18f-1039418.pdf?src-supplier=Digi-Key, ComponentLink3URL=https://datasheet.ciiva.com/1039/l0075s0097lqm18f-1039418.pdf?src-supplier=Digi-Key, ComponentLink4Description=https://datasheet.ciiva.com/1039/l0075s0097lqm18f-1039417.pdf?src-supplier=Digi-Key, ComponentLink4URL=https://datasheet.ciiva.com/1039/l0075s0097lqm18f-1039417.pdf?src-supplier=Digi-Key, ComponentLink5Description=https://datasheet.ciiva.com/1039/l0075s0097lqm18f-1039419.pdf?src-supplier=Digi-Key, ComponentLink5URL=https://datasheet.ciiva.com/1039/l0075s0097lqm18f-1039419.pdf?src-supplier=Digi-Key, ComponentLink6Description=https://datasheet.ciiva.com/8510/l0075s0097lqm18f-8510087.pdf?src-supplier=Avnet, ComponentLink6URL=https://datasheet.ciiva.com/8510/l0075s0097lqm18f-8510087.pdf?src-supplier=Avnet, Core Material=Ferrite, DC Current=50mA, Depth=0.9mm, Height=0.9mm, Height - Seated (Max)=0.035inch, Item Type=Inductor, Lead Free="Lead Free", Length=0.063inch, Manufacturer Part Number=LQM18FN100M00D, Max DC Current=50mA, Military Standard=Not, Mounting Technology="Surface Mount", Packaging="Tape and Reel", Pricing="25=0.11, 50=0.093, 500=0.082, 1000=0.071, 2500=0.066 (GBP)", RoHS=Yes, RoHS Compliant=Yes, Saturation Current=50mA, Series=LQM18F, Shielding=Shielded, Stock=525, Supplier=Rs, Termination=SMD/SMT, Width=0.031inch
LED1: library part NCD0603B3, "blue 0603 Light Emitting Diodes (LED) ROHS", LCSC Part Number=C158101, Manufacturer="Foshan NationStar Optoelectronics", Package=0603, ComponentLink1Description=LCSC, ComponentLink1URL=https://www.lcsc.com/product-detail/Light-Emitting-Diodes-LED_Foshan-NationStar-Optoelectronics-NCD0603B3_C158101.html, Item Type=LED, Manufacturer Part Number=NCD0603B3
LED2: library part NCD0603R3, "RED LED 0603 Light Emitting Diodes", LCSC Part Number=C3151730, Manufacturer="Foshan NationStar Optoelectronics", Package=0603, ComponentLink1Description=LCSC, ComponentLink1URL=https://www.lcsc.com/product-detail/Light-Emitting-Diodes-LED_Foshan-NationStar-Optoelectronics-NCD0603R3_C3151730.html, Item Type=LED, Manufacturer Part Number=NCD0603R3
P1 P2 P3: "Test Point ON", Item Type="Test Point"
R1 R6: library part RC0201FR-071KP, "RES 1K OHM 1% 1/20W 0201", LCSC Part Number=C3953443, Manufacturer=Yageo, Supplier Part Number 1=13-RC0201FR-071KPCT-ND, Manufacturer Part Number=RC0201FR-071KP, Pricing 1="1=0.11000, 10=0.10200, 100=0.03940, 1000=0.01734, 2500=0.01497, 5000=0.01340 (USD)", RoHS=Yes, RoHS Compliant=Yes, Stock 1=4800, Supplier 1=Digi-Key
R2 R14: library part RC0201FR-0715KL, "RES 15K OHM 1% 1/20W 0201", LCSC Part Number=C295774, Manufacturer=Yageo, Supplier Part Number 1=9770686, Voltage Rating (DC)=25V, Category="Chip SMD Resistors", ComponentLink1Description=https://datasheet.ciiva.com/6002/1563626-6002808.pdf?src-supplier=Farnell, ComponentLink1URL=https://datasheet.ciiva.com/6002/1563626-6002808.pdf?src-supplier=Farnell, ComponentLink2Description=https://datasheet.ciiva.com/22661/1563626-22661288.pdf?src-supplier=Element14, ComponentLink2URL=https://datasheet.ciiva.com/22661/1563626-22661288.pdf?src-supplier=Element14, Item Type=Resistor, Lead Free=5697LeadFree, Manufacturer Part Number=RC0201FR-0715KL, Pricing 1="10000=0.0035, 50000=0.0033, 250000=0.0031, 750000=0.003, 2000000=0.0028 (USD)", RoHS=Yes, Stock 1=360000, Supplier 1="Future Electronics"
R3 R4 R5: library part RC0201FR-074K7L, "RES 4.7K OHM 1% 1/20W 0201", LCSC Part Number=C138135, Manufacturer=Yageo, Supplier Part Number=7537285, Category="Chip SMD Resistors", ComponentLink1Description=https://datasheet.ciiva.com/2493/pyu-r-int-thick-7-2493811.pdf?src-supplier=Digi-Key, ComponentLink1URL=https://datasheet.ciiva.com/2493/pyu-r-int-thick-7-2493811.pdf?src-supplier=Digi-Key, ComponentLink2Description=https://datasheet.ciiva.com/2493/pyu-r-int-thick-7-2493812.pdf?src-supplier=Digi-Key, ComponentLink2URL=https://datasheet.ciiva.com/2493/pyu-r-int-thick-7-2493812.pdf?src-supplier=Digi-Key, ComponentLink3Description=https://datasheet.ciiva.com/2493/pyu-r-int-thick-7-2493813.pdf?src-supplier=Digi-Key, ComponentLink3URL=https://datasheet.ciiva.com/2493/pyu-r-int-thick-7-2493813.pdf?src-supplier=Digi-Key, ComponentLink4Description=https://datasheet.ciiva.com/8892/pyu-rc0201-51-rohs-l-8-8892942.pdf?src-supplier=Avnet, ComponentLink4URL=https://datasheet.ciiva.com/8892/pyu-rc0201-51-rohs-l-8-8892942.pdf?src-supplier=Avnet, ComponentLink5Description=https://datasheet.ciiva.com/7672/1563626-7672233.pdf?src-supplier=Element14, ComponentLink5URL=https://datasheet.ciiva.com/7672/1563626-7672233.pdf?src-supplier=Element14, Item Type=Resistor, Manufacturer Part Number=RC0201FR-074K7L, Pricing="10000=0.0014, 50000=0.0013, 250000=0.0013, 750000=0.0012, 2000000=0.0011 (USD)", RoHS=Yes, Stock=1610000, Supplier="Future Electronics"
R7 R8 R9 R10 R11 R13: library part RC0201FR-07100KL, "RES 100K OHM 1% 1/20W 0201", Case Code (Imperial)=0201, Case Code (Metric)=0603, Manufacturer=Yageo, Max Operating Temperature=125°C, Max Power Dissipation=50mW, Min Operating Temperature=-55°C, Package Quantity=10000, Resistance=100kR, Resistance Tolerance=1%, Resistor Type="Thick Film", Supplier Part Number 1=311-100KMCT-ND, Temperature Coefficient=200ppm/°C, Voltage Rating=25V, Case/Package=0201, Category="Chip SMD Resistors", ComponentLink1Description=https://datasheet.ciiva.com/7660/1421516-7660806.pdf?src-supplier=Element14, ComponentLink1URL=https://datasheet.ciiva.com/7660/1421516-7660806.pdf?src-supplier=Element14, ComponentLink2Description=https://datasheet.ciiva.com/22698/1563626-22698495.pdf?src-supplier=Element14, ComponentLink2URL=https://datasheet.ciiva.com/22698/1563626-22698495.pdf?src-supplier=Element14, ComponentLink3Description=https://datasheet.ciiva.com/46391/1421516-46391338.pdf?src-supplier=Element14, ComponentLink3URL=https://datasheet.ciiva.com/46391/1421516-46391338.pdf?src-supplier=Element14, ComponentLink4Description=https://datasheet.ciiva.com/2493/pyu-r-int-thick-7-2493770.pdf?src-supplier=Digi-Key, ComponentLink4URL=https://datasheet.ciiva.com/2493/pyu-r-int-thick-7-2493770.pdf?src-supplier=Digi-Key, ComponentLink5Description=https://datasheet.ciiva.com/2493/pyu-r-int-thick-7-2493771.pdf?src-supplier=Digi-Key, ComponentLink5URL=https://datasheet.ciiva.com/2493/pyu-r-int-thick-7-2493771.pdf?src-supplier=Digi-Key, ComponentLink6Description=https://datasheet.ciiva.com/2493/pyu-r-int-thick-7-2493769.pdf?src-supplier=Digi-Key, ComponentLink6URL=https://datasheet.ciiva.com/2493/pyu-r-int-thick-7-2493769.pdf?src-supplier=Digi-Key, ComponentLink7Description=https://datasheet.ciiva.com/26829/getdatasheetpartid-420441-26829850.pdf?src-supplier=Verical, ComponentLink7URL=https://datasheet.ciiva.com/26829/getdatasheetpartid-420441-26829850.pdf?src-supplier=Verical, Construction=Rectangular, Contact Plating=Tin,Matte, Depth=0.3mm, Features="Moisture Resistant", Height=0.01inch, Lead Free="Lead Free", Length=0.024inch, Manufacturer Part Number=RC0201FR-07100KL, Military Standard=Not, Number of Pins=2, Number of Terminations=2, Packaging="Tape and Reel", Power Rating=50mW, Pricing 1="1=0.10000, 10=0.03900, 100=0.01570, 1000=0.00705, 2500=0.00612, 5000=0.00506 (USD)", REACH SVHC="No SVHC", RoHS=Yes, RoHS Compliant=Yes, Series=RC, Size Code=0201, Stock 1=6740592, Supplier 1=Digi-Key, Termination=SMD/SMT, Tolerance=1%, Voltage Rating (DC)=25V, Width=0.012inch
R12: library part TC33X-2-105E, "TRIMMER 1M OHM 0.1W J LEAD TOP", LCSC Part Number=C5362465, Manufacturer=Bourns, Category="Variable Resistors and Potentiometers", ComponentLink1Description=https://datasheet.ciiva.com/6227/tc33-6227126.pdf?src-supplier=Digi-Key, ComponentLink1URL=https://datasheet.ciiva.com/6227/tc33-6227126.pdf?src-supplier=Digi-Key, ComponentLink2Description=https://datasheet.ciiva.com/43453/306tc33-43453797.pdf?src-supplier=Onlinecomponents.com, ComponentLink2URL=https://datasheet.ciiva.com/43453/306tc33-43453797.pdf?src-supplier=Onlinecomponents.com, Item Type="Variable Resistor", Manufacturer Part Number=TC33X-2-105E, Pricing="1=0.2738, 10=0.235, 25=0.2264, 100=0.2108, 250=0.2012, 500=0.1814, 1000=0.1356, 3000=0.126 (USD)", RoHS=Yes, Stock=5461, Supplier="Arrow Electronics", Supplier Part Number=TC33X-2-105E
SB1 SB2 SB3 SB4 SB5 SB6 SB7 SB8 SB9 SB10 SB11 SB12 SB13 SB14: "Solder Bridge ON", Item Type="Solder Bridge", Manufacturer Part Number="Solder Bridge 0402"
SW1: "SWITCH TACTILE SPST-NO 0.05A 12V", Contact Current Rating=50mA, Contact Resistance=100mR, Insulation Resistance=100MR, LCSC Part Number=C231329, Manufacturer=Omron, Max Operating Temperature=70°C, Max Voltage Rating (DC)=12V, Min Operating Temperature=-25°C, Operating Force=1.5N, Package Quantity=1, Ratings="Dust Proof,IP40", Supplier Part Number 1=SW1020DKR-ND, Actuator Length=0.4mm, Actuator Type=Standard, ComponentLink1Description=http://www.farnell.com/datasheets/60838.pdf?src-supplier=Farnell, ComponentLink1URL=http://www.farnell.com/datasheets/60838.pdf?src-supplier=Farnell, ComponentLink2Description=http://www.farnell.com/datasheets/60838.pdf?src-supplier=Element14, ComponentLink2URL=http://www.farnell.com/datasheets/60838.pdf?src-supplier=Element14, ComponentLink3Description=https://omronfs.omron.com/en_US/ecb/products/pdf/en-b3u.pdf?src-supplier=Digi-Key, ComponentLink3URL=https://omronfs.omron.com/en_US/ecb/products/pdf/en-b3u.pdf?src-supplier=Digi-Key, ComponentLink4Description=http://www.omron.com/ecb/products/pdf/en-b3u.pdf?src-supplier=Digi-Key, ComponentLink4URL=http://www.omron.com/ecb/products/pdf/en-b3u.pdf?src-supplier=Digi-Key, ComponentLink5Description=https://www.distrelec.biz/Web/Downloads/he/et/B3U_eng_datasheet.pdf?mime=application%2Fpdf&src-supplier=Distrelec, ComponentLink5URL=https://www.distrelec.biz/Web/Downloads/he/et/B3U_eng_datasheet.pdf?mime=application%2Fpdf&src-supplier=Distrelec, ComponentLink6Description=http://www.onlinecomponents.com/productFiles/mf-OM/en-b3u.pdf?src-supplier=Onlinecomponents.com, ComponentLink6URL=http://www.onlinecomponents.com/productFiles/mf-OM/en-b3u.pdf?src-supplier=Onlinecomponents.com, ComponentLink7Description=https://www.verical.com/server-webapp/html/getDatasheet?partID=552554&src-supplier=Verical, ComponentLink7URL=https://www.verical.com/server-webapp/html/getDatasheet?partID=552554&src-supplier=Verical, ComponentLink8Description=http://www.farnell.com/datasheets/1685550.pdf?src-supplier=Element14, ComponentLink8URL=http://www.farnell.com/datasheets/1685550.pdf?src-supplier=Element14, ComponentLink9Description=http://www.farnell.com/datasheets/2610940.pdf?src-supplier=Farnell, ComponentLink9URL=http://www.farnell.com/datasheets/2610940.pdf?src-supplier=Farnell, ComponentLink10Description=https://www.alliedelec.com/m/d/4c8a9ef82804fc3c241a13c1e298fd73.pdf?src-supplier=Allied+Electronics, ComponentLink10URL=https://www.alliedelec.com/m/d/4c8a9ef82804fc3c241a13c1e298fd73.pdf?src-supplier=Allied+Electronics, Contact Material=Silver, Current Rating=50mA, Depth=2.5mm, Electrical Life=200000Cycles, Height=1.2mm, Illumination Type=Non-Illuminated,Illuminated, Item Type=Switch, Lead Free="Lead Free", Length=4mm, Manufacturer Part Number=B3U-1000P, Max Current Rating=50mA, Mechanical Life=200000Cycles, Mount="Surface Mount", Orientation=Straight, Packaging="Tape and Reel", Pricing 1="1=1, 10=0.961, 25=0.9064, 50=0.7976, 100=0.7251, 250=0.68888, 500=0.67074, 1000=0.52571 (USD)", REACH SVHC=Unknown, Stock 1=116454, Supplier 1=Digi-Key, Switch Function=Off-Mom, Switch Travel=0.15mm, Termination=SMD/SMT, Throw Configuration=SPST, Voltage Rating (DC)=12V, Weight=0.000776oz, Width=3mm
U1: "RF TXRX MODULE BLUETOOTH SMD", Manufacturer="Microchip Technology", Package=82-VFBGA, Item Type=IC, Manufacturer Part Number=IS2083BM-232
U2: "IC AMP AUDIO PWR 3.2W D 9DSBGA", Case/Package=BGA, Manufacturer="Texas Instruments", Max Operating Temperature=85°C, Max Output Power=3.24W, Max Power Dissipation=525mW, Max Supply Voltage=5.5V, Min Operating Temperature=-40°C, Min Supply Voltage=2.5V, Output Power=3.2W, Package Quantity=3000, Power Supply Rejection Ratio (PSRR)=86dB, Quiescent Current=1.8mA, Supplier Part Number 1=595-TPA2011D1YFFR, Supply Current=1.5mA, Category="Amplifiers - Audio", ComponentLink1Description=https://datasheet.ciiva.com/1789/tpa2011d1-1789073.pdf?src-supplier=Digi-Key, ComponentLink1URL=https://datasheet.ciiva.com/1789/tpa2011d1-1789073.pdf?src-supplier=Digi-Key, ComponentLink2Description=https://datasheet.ciiva.com/1789/tpa2011d1-1789074.pdf?src-supplier=Digi-Key, ComponentLink2URL=https://datasheet.ciiva.com/1789/tpa2011d1-1789074.pdf?src-supplier=Digi-Key, ComponentLink3Description=https://datasheet.ciiva.com/1789/tpa2011d1-1789075.pdf?src-supplier=Digi-Key, ComponentLink3URL=https://datasheet.ciiva.com/1789/tpa2011d1-1789075.pdf?src-supplier=Digi-Key, ComponentLink4Description=https://datasheet.ciiva.com/15223/getdatasheetpartid-306371-15223959.pdf?src-supplier=Verical, ComponentLink4URL=https://datasheet.ciiva.com/15223/getdatasheetpartid-306371-15223959.pdf?src-supplier=Verical, Lead Free="Lead Free", Manufacturer Part Number=TPA2011D1YFFR, Number of Channels=1, Number of Pins=9, Packaging="Tape and Reel", Power Dissipation=525mW, Pricing 1="1=0.83, 10=0.698, 50=0.698, 100=0.529, 1000=0.353, 10000=0.293 (USD)", Radiation Hardening=No, RoHS=Yes, RoHS Compliant=Yes, Series=-, Stock 1=6964, Supplier 1=Mouser
U3: "3 CHANNEL TOUCH CONTROLLER, GPIO", Manufacturer=Microchip, Supplier Part Number=150-MTCH1030T-E/MGCT-ND, Item Type=IC, Manufacturer Part Number=MTCH1030T-E/MG, Pricing="1=1, 25=0.92, 100=0.83 (USD)", RoHS=No, Stock=3300, Supplier=Digi-Key
X1: library part CSTCE16M0V53-R0, "16MHz 15pF ±0.5%", Capacitance=15pF, Case/Package=SMD/SMT, Frequency Stability=0.3%, Frequency Tolerance=0.5%, LCSC Part Number=C32180, Manufacturer=Murata, Max Operating Temperature=80°C, Min Operating Temperature=-20°C, Package Quantity=3000, Resistor Type=Ceramic, Supplier Part Number 1=2443265, Category=Capacitors, ComponentLink1Description=https://datasheet.ciiva.com/18183/getdatasheetpartid-152969-18183272.pdf?src-supplier=Verical, ComponentLink1URL=https://datasheet.ciiva.com/18183/getdatasheetpartid-152969-18183272.pdf?src-supplier=Verical, ComponentLink2Description=https://datasheet.ciiva.com/1361/1506176-1361293.pdf?src-supplier=Element14, ComponentLink2URL=https://datasheet.ciiva.com/1361/1506176-1361293.pdf?src-supplier=Element14, ComponentLink3Description=https://datasheet.ciiva.com/14132/ceralock-eng-bro-14132735.pdf?src-supplier=Distrelec, ComponentLink3URL=https://datasheet.ciiva.com/14132/ceralock-eng-bro-14132735.pdf?src-supplier=Distrelec, ComponentLink4Description=https://datasheet.ciiva.com/884/p16e-884478.pdf?src-supplier=Digi-Key, ComponentLink4URL=https://datasheet.ciiva.com/884/p16e-884478.pdf?src-supplier=Digi-Key, ComponentLink5Description=https://datasheet.ciiva.com/884/p16e-884477.pdf?src-supplier=Digi-Key, ComponentLink5URL=https://datasheet.ciiva.com/884/p16e-884477.pdf?src-supplier=Digi-Key, ComponentLink6Description=https://datasheet.ciiva.com/884/p16e-884479.pdf?src-supplier=Digi-Key, ComponentLink6URL=https://datasheet.ciiva.com/884/p16e-884479.pdf?src-supplier=Digi-Key, ComponentLink7Description=https://datasheet.ciiva.com/16216/l0430e-16216847.pdf?src-supplier=Future+Electronics, ComponentLink7URL=https://datasheet.ciiva.com/16216/l0430e-16216847.pdf?src-supplier=Future+Electronics, Contact Plating=Gold, Frequency=16MHz, Height=0.9mm, Impedance=40R, Item Type=Cystal, Lead Free="Lead Free", Length=3.2mm, Load Capacitance=15pF, Manufacturer Part Number=CSTCE16M0V53-R0, Number of Pins=3, Packaging="Tape and Reel", Pricing 1="5=0.34500, 50=0.26100, 250=0.23600, 500=0.19400, 1500=0.18300, 3000=0.17100, 15000=0.16800 (GBP)", Reach SVHC Compliant=Yes, RoHS=Yes, RoHS Compliant=Yes, Self Resonant Frequency=16MHz, Series="CERALOCK® CSTCE", Supplier 1=Farnell, Termination=SMD/SMT, Tolerance=0.5%, Weight=0.001023oz, Width=1.3mm

## Free pads (board coordinates)
  round 0 hole 78.74 unplated: MH4(-51.04,395.1) MH5(-600,894.88)

## Via types
v1: diameter 11.81, hole 5.91, Top Layer to Bottom Layer, tented both sides, 128 vias

## Nets (pads, with @x,y where several pads share a name; then routed paths per layer and width w, separated by ;. In a path a pad name is that pad's centre, name@x,y a point inside that pad or via, vN(x,y) a via of type N, cw(c..) or ccw(c..) an arc to the next point about the centre after c; other vN are vias at no path point)
1/3_VCC: R11.2 R13.1 SB9.2 SB13.2 | length 167.8
  Bottom Layer w8: R13.1 R11.2 -564.92,559.65 -542.81,581.75 -506.76,581.75 -486.01,561 SB13.2
1V2: C1.1 C7.1 U1.G8 U1.H5 U1.H10 U1.J6 | length 98.2
  Top Layer w7: v1(-315.85,695.83) U1.G8 ; v1(-296.17,636.78) U1.H5 ; v1(-296.17,735.2) U1.H10 ; v1(-276.48,656.46) U1.J6
  Bottom Layer w7: v1(-315.85,695.83) v1(-315.85,695.83) -315.8,715.57 ; C7.1@-296.36,658.63 C7.1 v1(-276.48,656.46) ; C1.1@-269.51,761.87 -268.28,761.87 C1.1
1V5: C4.2 C6.2 C17.2 C22.2 L2.2 U1.A9 U1.B7 U1.G10 U1.K3 | length 195.1
  Top Layer w7: U1.A9 -424.58,725.04 -415.41,734.21 v1(-415.41,734.35) ; v1(-414.28,694.91) U1.B7 ; v1(-315.85,735.2) U1.G10 ; U1.K3 v1(-238.04,597.41) -217.75,577.12 -206.35,577.12 -206.29,577.06
  Top Layer w9: -206.29,577.06 L2.2 L2.2
  Bottom Layer w7: v1(-315.85,735.2) C4.2
  Bottom Layer w8: C6.2 C4.2 C17.2
1V8: C11.2 C24.2 L3.2 U1.A4 U1.H1 U1.K7 | length 130.3
  Top Layer w7: C11.2 v1(-433.96,617.09) U1.A4 ; v1(-296.17,558.04) U1.H1 ; C24.2 v1(-133,694.59)
  Top Layer w9: U1.K7 L3.2
2/3_VCC: R10.2 R11.1 SB8.2 SB12.2 | length 204.2
  Bottom Layer w8: R10.2 R11.1 -547.35,537.99 -524.34,561 SB8.2 ; SB8.2@-517.34,561 -498.94,542.6 -427.74,542.6 -409.34,561 SB12.2
AOHPR: C28.1 U1.A5 | length 464.6
  Top Layer w7: v1(-676.58,431.18) C28.1 ; v1(-433.96,636.78) U1.A5
  PWR w7: v1(-676.58,431.18) -631.73,431.18 -621,441.91 -621,623.65 -607.87,636.78 v1(-433.96,636.78)
BK1_LX: L2.1 U1.K2 | length 102.2
  Top Layer w7: U1.K2 -217.26,556.94
  Top Layer w9: -217.26,556.94 -209.04,548.73 -190.6,548.73 -184,542.13 L2.1
BK2_LX: L3.1 U1.K8 | length 65.2
  Top Layer w8: U1.K8 -236.22,705.21 -200.79,740.65 L3.1
BUTTON_0: J5.1 R9.1 | length 404.2
  Top Layer w8: J5.1 -681.37,288.31 -367.57,288.31 -340.19,315.69 R9.1
BUTTON_1: J5.2 R8.1 | length 389.1
  Top Layer w8: J5.2 -580.99,246.04 -558.97,268.06 -360.98,268.06 -318.72,310.31 -318.72,369.16 -327.56,377.99 -340.15,377.99 R8.1
BUTTON_2: J5.3 R7.1 | length 359.2
  Top Layer w8: J5.3@-494.14,214.48 -486.76,214.48 -453.17,248.07 -355.22,248.07 -300.79,302.5 -300.79,384.55 -319.96,403.72 R7.1
CFG0: SB7.1 SB8.1 SB9.1 SB10.1 U3.12 | length 66.5
  Top Layer w8: v1(-501.56,504.05) -483.54,486.03 U3.12
CFG1: SB11.1 SB12.1 SB13.1 SB14.1 U3.11 | length 87.2
  Top Layer w8: U3.11 -463.86,486.03 -445.84,504.05 v1(-425.2,504.05)
CFG2: R12.2 U3.10 | length 362.4
  Top Layer w8: R12.2 -582.99,536.01 -571.72,524.74 -413.15,524.74 -403.28,514.87 -403.28,492.77 -413.14,482.91 -433.96,482.91 -444.17,472.7 U3.10
DEBUG_CLOCK: J3.5 U1.B5 | length 526.1
  Top Layer w7: J3.5 -409.08,876.08 -398.55,876.08 v1(-398.47,876) ; v1(-414.28,636.78) U1.B5
  PWR w7: v1(-414.28,636.78) -414.28,651.63 -429.28,666.63 -518.96,666.63 -530,677.67 -530,856.72 -510.72,876 v1(-398.47,876)
DEBUG_DATA: J3.4 U1.B6 | length 452.5
  Top Layer w7: U1.B6@-404.88,665.84 v1(-395.52,656.5) ; v1(-379.53,876) -379.45,876.08 -368.93,876.08 J3.4
  PWR w7: v1(-395.52,656.5) -434.73,695.72 -484.49,695.72 -493,704.23 -493,827.84 -477.84,843 -392.1,843 -379.53,855.58 v1(-379.53,876)
DRIVEN_SHIELD: J5.4 R6.2 | length 345.9
  Top Layer w8: J5.4 -393.58,182.91 -283.36,293.14 -283.36,400.47 -312.32,429.43 R6.2